# Altium PCB PCB_14layers_1mm73.PcbDoc (part 2 of 4)
Units mm, origin at the board's own origin, x right, y up, seen from the top; angles counter-clockwise.
Board outline 66 x 50 mm, 14 copper layers (Top Layer, Int1 (GND), Int2 (PWR), Int3 (Sign), GND, Int4 (Sign), Int5 (GND), Int6 (PWR), Int7 (Sign), GND2, Int8 (Sign), Int9 (PWR), Int10 (GND), Bottom Layer), stack 1.644 mm thick; 436 components, 541 nets, 2990 pads, 78 vias.
Unrouted connection lines stored in the file: 1647.
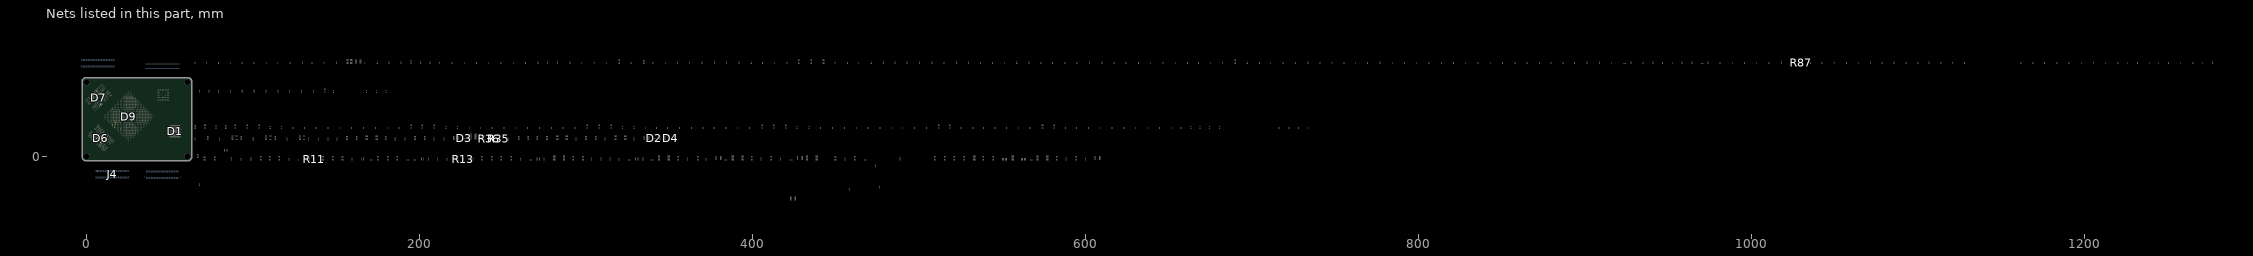
[diagram p14: the nets of this part, all layers, seen from the top]

## Components (designator, comment, footprint, x,y, rotation, side; value= is the part's Value field where it differs from the comment) (continued)
R53 "RC0201FR-0749R9L" RESC0603X02N 728.073,17 r90 top value=49R9
R55 "RC0201FR-0749R9L" RESC0603X02N 716.373,17 r90 top value=49R9
R57 "RC0201FR-07240RL" RESC0603X02N 657.473,17 r90 top value=240R
R58 "RC0402JR-0710KL" RESC1005X04N 680.473,17.3 r90 top value=10K
R59 "RC0402JR-0710KL" RESC1005X04N 668.773,17.3 r90 top value=10K
R61 "RC0201FR-0749R9L" RESC0603X02N 733.973,17 r90 top value=49R9
R63 "RC0201FR-0749R9L" RESC0603X02N 722.273,17 r90 top value=49R9
R65 "RC0603JR-070RL" RESC1608X05N 77.674,17.7 r90 top value=0R
R66 "NC0603" RESC1608X05N 65.174,17.7 r90 top value=NC
R67 "RC0603JR-070RL" RESC1608X05N 83.474,17.7 r90 top value=0R
R68 "RC0402JR-0710KL" RESC1005X04N 168.074,38.9 r90 top value=10K
R69 "RC0402JR-0710KL" RESC1005X04N 173.974,38.9 r90 top value=10K
R70 "RC0402JR-0710KL" RESC1005X04N 179.774,38.9 r90 top value=10K
R71 "RC0603FR-0747KL" RESC1608X05N 142.974,39.4 r90 top value=47K
R72 "RC0402JR-070RL" RESC1005X04N 148.174,38.9 r90 top value=0R
R73 "RC0201FR-07240RL" RESC0603X02N 1220.472,55.999 r90 top value=240R
R74 "RC0402JR-0722RL" RESC1005X04N 271.174,56.299 r90 top value=22R
R75 "RC0402JR-07510KL" RESC1005X04N 200.474,56.299 r90 top value=510K
R76 "RC0201FR-07240RL" RESC0603X02N 1226.272,55.999 r90 top value=240R
R77 "RC0402JR-0722RL" RESC1005X04N 276.974,56.299 r90 top value=22R
R78 "RC0402JR-07100KL" RESC1005X04N 188.774,56.299 r90 top value=100K
R79 "NC0402" RESC1005X04N 206.374,56.299 r90 top value=NC
R80 "RC0402JR-07120KL" RESC1005X04N 150.174,56.299 r90 top value=120K
R81 "RC0201FR-07240RL" RESC0603X02N 1239.472,55.999 r90 top value=240R
R82 "RC0201FR-07240RL" RESC0603X02N 1244.872,55.999 r90 top value=240R
R83 "RC0201JR-072K2L" RESC0603X02N 946.672,55.999 r90 top value=2K2
R84 "RC0201JR-072K2L" RESC0603X02N 952.572,55.999 r90 top value=2K2
R85 "RC0402JR-07100KL" RESC1005X04N 964.372,56.299 r90 top value=100K
R86 "RC0402JR-07120KL" RESC1005X04N 958.572,56.299 r90 top value=120K
R87 "RC0402JR-0722RL" RESC1005X04N 1029.972,56.299 r90 top value=22R
R88 "RC0603JR-070RL" RESC1608X05N 194.874,56.699 r90 top value=0R
R89 "RC0603JR-070RL" RESC1608X05N 334.574,56.699 r90 top value=0R
R90 "RC0201JR-070RL" RESC0603X02N 1265.472,55.999 r90 top value=0R
R91 "RC0402JR-0722RL" RESC1005X04N 1277.272,56.299 r90 top value=22R
R92 "RC0201JR-070RL" RESC0603X02N 1271.272,55.999 r90 top value=0R
R93 "RC0402JR-07100KL" RESC1005X04N 129.574,56.299 r90 top value=100K
R94 "NC0402" RESC1005X04N 1024.072,56.299 r90 top value=NC
R95 "NC0402" RESC1005X04N 935.172,56.299 r90 top value=NC
R96 "NC0402" RESC1005X04N 1018.272,56.299 r90 top value=NC
R97 "NC0402" RESC1005X04N 940.972,56.299 r90 top value=NC
VD1 "AZ5825-01F-MS" DIOC1006X04N 127.074,-1.9 r90 top
ZQ1 "E3SB24.0000F08E11" X322525MOB4SI 157.774,56.999 r0 top value=24MHz

## Footprints (in the part's own frame and the unit in brackets; to place one, negate y for a bottom-side part, rotate by r counter-clockwise, add the part's x,y. Pads: shape width x height; smd on the part's side, far side on the other; paste and mask are expansions set on the pad)
BGA196C50P14X14_1170X1300X170 [mm] "BGA, 196-Leads, Body 11,70x13,00mmx1,70mm, Pitch 0,50mm"
  round 0.25 smd: A1(-3.25,3.25) A2(-2.75,3.25) A3(-2.25,3.25) A4(-1.75,3.25) A5(-1.25,3.25) A6(-0.75,3.25) A7(-0.25,3.25) A8(0.25,3.25) A9(0.75,3.25) A10(1.25,3.25) A11(1.75,3.25) A12(2.25,3.25) A13(2.75,3.25) A14(3.25,3.25) B1(-3.25,2.75) B2(-2.75,2.75) B3(-2.25,2.75) B4(-1.75,2.75) B5(-1.25,2.75) B6(-0.75,2.75) B7(-0.25,2.75) B8(0.25,2.75) B9(0.75,2.75) B10(1.25,2.75) B11(1.75,2.75) B12(2.25,2.75) B13(2.75,2.75) B14(3.25,2.75) C1(-3.25,2.25) C2(-2.75,2.25) C3(-2.25,2.25) C4(-1.75,2.25) C5(-1.25,2.25) C6(-0.75,2.25) C7(-0.25,2.25) C8(0.25,2.25) C9(0.75,2.25) C10(1.25,2.25) C11(1.75,2.25) C12(2.25,2.25) C13(2.75,2.25) C14(3.25,2.25) D1(-3.25,1.75) D2(-2.75,1.75) D3(-2.25,1.75) D4(-1.75,1.75) D12(2.25,1.75) D13(2.75,1.75) D14(3.25,1.75) E1(-3.25,1.25) E2(-2.75,1.25) E3(-2.25,1.25) E5(-1.25,1.25) E6(-0.75,1.25) E7(-0.25,1.25) E8(0.25,1.25) E9(0.75,1.25) E10(1.25,1.25) E12(2.25,1.25) E13(2.75,1.25) E14(3.25,1.25) F1(-3.25,0.75) F2(-2.75,0.75) F3(-2.25,0.75) F5(-1.25,0.75) F10(1.25,0.75) F12(2.25,0.75) F13(2.75,0.75) F14(3.25,0.75) G1(-3.25,0.25) G2(-2.75,0.25) G3(-2.25,0.25) G5(-1.25,0.25) G10(1.25,0.25) G12(2.25,0.25) G13(2.75,0.25) G14(3.25,0.25) H1(-3.25,-0.25) H2(-2.75,-0.25) H3(-2.25,-0.25) H5(-1.25,-0.25) H10(1.25,-0.25) H12(2.25,-0.25) H13(2.75,-0.25) H14(3.25,-0.25) J1(-3.25,-0.75) J2(-2.75,-0.75) J3(-2.25,-0.75) J5(-1.25,-0.75) J10(1.25,-0.75) J12(2.25,-0.75) J13(2.75,-0.75) J14(3.25,-0.75) K1(-3.25,-1.25) K2(-2.75,-1.25) K3(-2.25,-1.25) K5(-1.25,-1.25) K6(-0.75,-1.25) K7(-0.25,-1.25) K8(0.25,-1.25) K9(0.75,-1.25) K10(1.25,-1.25) K12(2.25,-1.25) K13(2.75,-1.25) K14(3.25,-1.25) L1(-3.25,-1.75) L2(-2.75,-1.75) L3(-2.25,-1.75) L12(2.25,-1.75) L13(2.75,-1.75) L14(3.25,-1.75) M1(-3.25,-2.25) M2(-2.75,-2.25) M3(-2.25,-2.25) M4(-1.75,-2.25) M5(-1.25,-2.25) M6(-0.75,-2.25) M7(-0.25,-2.25) M8(0.25,-2.25) M9(0.75,-2.25) M10(1.25,-2.25) M11(1.75,-2.25) M12(2.25,-2.25) M13(2.75,-2.25) M14(3.25,-2.25) N1(-3.25,-2.75) N2(-2.75,-2.75) N3(-2.25,-2.75) N4(-1.75,-2.75) N5(-1.25,-2.75) N6(-0.75,-2.75) N7(-0.25,-2.75) N8(0.25,-2.75) N9(0.75,-2.75) N10(1.25,-2.75) N11(1.75,-2.75) N12(2.25,-2.75) N13(2.75,-2.75) N14(3.25,-2.75) P1(-3.25,-3.25) P2(-2.75,-3.25) P3(-2.25,-3.25) P4(-1.75,-3.25) P5(-1.25,-3.25) P6(-0.75,-3.25) P7(-0.25,-3.25) P8(0.25,-3.25) P9(0.75,-3.25) P10(1.25,-3.25) P11(1.75,-3.25) P12(2.25,-3.25) P13(2.75,-3.25) P14(3.25,-3.25)
  silkscreen extent -6.62,-6.5 5.85,6.5, body extent -5.85,-6.5 5.85,6.5, height 0.72
BGA200C65P12X22_1000X1450X114 [mm]
  round 0.399 smd paste+0 mask+0.05: A1(-4.4,6.825) A2(-3.6,6.825) A3(-2.8,6.825) A4(-2,6.825) A5(-1.2,6.825) A8(1.2,6.825) A9(2,6.825) A10(2.8,6.825) A11(3.6,6.825) A12(4.4,6.825) AA1(-4.4,-6.175) AA2(-3.6,-6.175) AA3(-2.8,-6.175) AA4(-2,-6.175) AA5(-1.2,-6.175) AA8(1.2,-6.175) AA9(2,-6.175) AA10(2.8,-6.175) AA11(3.6,-6.175) AA12(4.4,-6.175) AB1(-4.4,-6.825) AB2(-3.6,-6.825) AB3(-2.8,-6.825) AB4(-2,-6.825) AB5(-1.2,-6.825) AB8(1.2,-6.825) AB9(2,-6.825) AB10(2.8,-6.825) AB11(3.6,-6.825) AB12(4.4,-6.825) B1(-4.4,6.175) B2(-3.6,6.175) B3(-2.8,6.175) B4(-2,6.175) B5(-1.2,6.175) B8(1.2,6.175) B9(2,6.175) B10(2.8,6.175) B11(3.6,6.175) B12(4.4,6.175) C1(-4.4,5.525) C2(-3.6,5.525) C3(-2.8,5.525) C4(-2,5.525) C5(-1.2,5.525) C8(1.2,5.525) C9(2,5.525) C10(2.8,5.525) C11(3.6,5.525) C12(4.4,5.525) D1(-4.4,4.875) D2(-3.6,4.875) D3(-2.8,4.875) D4(-2,4.875) D5(-1.2,4.875) D8(1.2,4.875) D9(2,4.875) D10(2.8,4.875) D11(3.6,4.875) D12(4.4,4.875) E1(-4.4,4.225) E2(-3.6,4.225) E3(-2.8,4.225) E4(-2,4.225) E5(-1.2,4.225) E8(1.2,4.225) E9(2,4.225) E10(2.8,4.225) E11(3.6,4.225) E12(4.4,4.225) F1(-4.4,3.575) F2(-3.6,3.575) F3(-2.8,3.575) F4(-2,3.575) F5(-1.2,3.575) F8(1.2,3.575) F9(2,3.575) F10(2.8,3.575) F11(3.6,3.575) F12(4.4,3.575) G1(-4.4,2.925) G2(-3.6,2.925) G3(-2.8,2.925) G4(-2,2.925) G5(-1.2,2.925) G8(1.2,2.925) G9(2,2.925) G10(2.8,2.925) G11(3.6,2.925) G12(4.4,2.925) H1(-4.4,2.275) H2(-3.6,2.275) H3(-2.8,2.275) H4(-2,2.275) H5(-1.2,2.275) H8(1.2,2.275) H9(2,2.275) H10(2.8,2.275) H11(3.6,2.275) H12(4.4,2.275) J1(-4.4,1.625) J2(-3.6,1.625) J3(-2.8,1.625) J4(-2,1.625) J5(-1.2,1.625) J8(1.2,1.625) J9(2,1.625) J10(2.8,1.625) J11(3.6,1.625) J12(4.4,1.625) K1(-4.4,0.975) K2(-3.6,0.975) K3(-2.8,0.975) K4(-2,0.975) K5(-1.2,0.975) K8(1.2,0.975) K9(2,0.975) K10(2.8,0.975) K11(3.6,0.975) K12(4.4,0.975) N1(-4.4,-0.975) N2(-3.6,-0.975) N3(-2.8,-0.975) N4(-2,-0.975) N5(-1.2,-0.975) N8(1.2,-0.975) N9(2,-0.975) N10(2.8,-0.975) N11(3.6,-0.975) N12(4.4,-0.975) P1(-4.4,-1.625) P2(-3.6,-1.625) P3(-2.8,-1.625) P4(-2,-1.625) P5(-1.2,-1.625) P8(1.2,-1.625) P9(2,-1.625) P10(2.8,-1.625) P11(3.6,-1.625) P12(4.4,-1.625) R1(-4.4,-2.275) R2(-3.6,-2.275) R3(-2.8,-2.275) R4(-2,-2.275) R5(-1.2,-2.275) R8(1.2,-2.275) R9(2,-2.275) R10(2.8,-2.275) R11(3.6,-2.275) R12(4.4,-2.275) T1(-4.4,-2.925) T2(-3.6,-2.925) T3(-2.8,-2.925) T4(-2,-2.925) T5(-1.2,-2.925) T8(1.2,-2.925) T9(2,-2.925) T10(2.8,-2.925) T11(3.6,-2.925) T12(4.4,-2.925) U1(-4.4,-3.575) U2(-3.6,-3.575) U3(-2.8,-3.575) U4(-2,-3.575) U5(-1.2,-3.575) U8(1.2,-3.575) U9(2,-3.575) U10(2.8,-3.575) U11(3.6,-3.575) U12(4.4,-3.575) V1(-4.4,-4.225) V2(-3.6,-4.225) V3(-2.8,-4.225) V4(-2,-4.225) V5(-1.2,-4.225) V8(1.2,-4.225) V9(2,-4.225) V10(2.8,-4.225) V11(3.6,-4.225) V12(4.4,-4.225) W1(-4.4,-4.875) W2(-3.6,-4.875) W3(-2.8,-4.875) W4(-2,-4.875) W5(-1.2,-4.875) W8(1.2,-4.875) W9(2,-4.875) W10(2.8,-4.875) W11(3.6,-4.875) W12(4.4,-4.875) Y1(-4.4,-5.525) Y2(-3.6,-5.525) Y3(-2.8,-5.525) Y4(-2,-5.525) Y5(-1.2,-5.525) Y8(1.2,-5.525) Y9(2,-5.525) Y10(2.8,-5.525) Y11(3.6,-5.525) Y12(4.4,-5.525)
  silkscreen extent -6.05,-8.3 6.05,8.3, body extent -5,-7.25 5,7.25, height 1.14
BGA1088C65P34X34_2300X2300X204N [mm]
  round 0.34 smd: A1(-10.725,10.725) A2(-10.075,10.725) A3(-9.425,10.725) A4(-8.775,10.725) A5(-8.125,10.725) A6(-7.475,10.725) A7(-6.825,10.725) A8(-6.175,10.725) A9(-5.525,10.725) A10(-4.875,10.725) A11(-4.225,10.725) A12(-3.575,10.725) A13(-2.925,10.725) A14(-2.275,10.725) A15(-1.625,10.725) A16(-0.975,10.725) A17(-0.325,10.725) A18(0.325,10.725) A19(0.975,10.725) A20(1.625,10.725) A21(2.275,10.725) A22(2.925,10.725) A23(3.575,10.725) A24(4.225,10.725) A25(4.875,10.725) A26(5.525,10.725) A27(6.175,10.725) A28(6.825,10.725) A30(8.125,10.725) A32(9.425,10.725) A33(10.075,10.725) A34(10.725,10.725) AA1(-10.725,-2.275) AA2(-10.075,-2.275) AA3(-9.425,-2.275) AA4(-8.775,-2.275) AA5(-8.125,-2.275) AA6(-7.475,-2.275) AA7(-6.825,-2.275) AA8(-6.175,-2.275) AA9(-5.525,-2.275) AA10(-4.875,-2.275) AA11(-4.225,-2.275) AA12(-3.575,-2.275) AA13(-2.925,-2.275) AA14(-2.275,-2.275) AA15(-1.625,-2.275) AA16(-0.975,-2.275) AA17(-0.325,-2.275) AA18(0.325,-2.275) AA19(0.975,-2.275) AA20(1.625,-2.275) AA21(2.275,-2.275) AA22(2.925,-2.275) AA23(3.575,-2.275) AA24(4.225,-2.275) AA25(4.875,-2.275) AA26(5.525,-2.275) AA27(6.175,-2.275) AA28(6.825,-2.275) AA29(7.475,-2.275) AA30(8.125,-2.275) AA31(8.775,-2.275) AA32(9.425,-2.275) AA33(10.075,-2.275) AA34(10.725,-2.275) AB1(-10.725,-2.925) AB2(-10.075,-2.925) AB3(-9.425,-2.925) AB4(-8.775,-2.925) AB5(-8.125,-2.925) AB6(-7.475,-2.925) AB7(-6.825,-2.925) AB8(-6.175,-2.925) AB9(-5.525,-2.925) AB10(-4.875,-2.925) AB11(-4.225,-2.925) AB12(-3.575,-2.925) AB13(-2.925,-2.925) AB14(-2.275,-2.925) AB15(-1.625,-2.925) AB16(-0.975,-2.925) AB17(-0.325,-2.925) AB18(0.325,-2.925) AB19(0.975,-2.925) AB20(1.625,-2.925) AB21(2.275,-2.925) AB22(2.925,-2.925) AB23(3.575,-2.925) AB24(4.225,-2.925) AB25(4.875,-2.925) AB26(5.525,-2.925) AB27(6.175,-2.925) AB28(6.825,-2.925) AB29(7.475,-2.925) AB30(8.125,-2.925) AB31(8.775,-2.925) AB32(9.425,-2.925) AB33(10.075,-2.925) AB34(10.725,-2.925) AC1(-10.725,-3.575) AC2(-10.075,-3.575) AC3(-9.425,-3.575) AC4(-8.775,-3.575) AC5(-8.125,-3.575) AC6(-7.475,-3.575) AC7(-6.825,-3.575) AC8(-6.175,-3.575) AC9(-5.525,-3.575) AC10(-4.875,-3.575) AC11(-4.225,-3.575) AC12(-3.575,-3.575) AC13(-2.925,-3.575) AC14(-2.275,-3.575) AC15(-1.625,-3.575) AC16(-0.975,-3.575) AC17(-0.325,-3.575) AC18(0.325,-3.575) AC19(0.975,-3.575) AC20(1.625,-3.575) AC21(2.275,-3.575) AC22(2.925,-3.575) AC23(3.575,-3.575) AC24(4.225,-3.575) AC25(4.875,-3.575) AC26(5.525,-3.575) AC27(6.175,-3.575) AC28(6.825,-3.575) AC29(7.475,-3.575) AC30(8.125,-3.575) AC31(8.775,-3.575) AC32(9.425,-3.575) AC33(10.075,-3.575) AC34(10.725,-3.575) AD1(-10.725,-4.225) AD2(-10.075,-4.225) AD3(-9.425,-4.225) AD4(-8.775,-4.225) AD5(-8.125,-4.225) AD6(-7.475,-4.225) AD7(-6.825,-4.225) AD8(-6.175,-4.225) AD9(-5.525,-4.225) AD10(-4.875,-4.225) AD11(-4.225,-4.225) AD12(-3.575,-4.225) AD13(-2.925,-4.225) AD14(-2.275,-4.225) AD15(-1.625,-4.225) AD16(-0.975,-4.225) AD17(-0.325,-4.225) AD18(0.325,-4.225) AD19(0.975,-4.225) AD20(1.625,-4.225) AD21(2.275,-4.225) AD22(2.925,-4.225) AD23(3.575,-4.225) AD24(4.225,-4.225) AD25(4.875,-4.225) AD26(5.525,-4.225) AD27(6.175,-4.225) AD28(6.825,-4.225) AD29(7.475,-4.225) AD30(8.125,-4.225) AD31(8.775,-4.225) AD32(9.425,-4.225) AD33(10.075,-4.225) AD34(10.725,-4.225) AE1(-10.725,-4.875) AE2(-10.075,-4.875) AE3(-9.425,-4.875) AE4(-8.775,-4.875) AE5(-8.125,-4.875) AE6(-7.475,-4.875) AE7(-6.825,-4.875) AE8(-6.175,-4.875) AE9(-5.525,-4.875) AE11(-4.225,-4.875) AE12(-3.575,-4.875) AE13(-2.925,-4.875) AE14(-2.275,-4.875) AE15(-1.625,-4.875) AE16(-0.975,-4.875) AE18(0.325,-4.875) AE19(0.975,-4.875) AE20(1.625,-4.875) AE21(2.275,-4.875) AE22(2.925,-4.875) AE23(3.575,-4.875) AE24(4.225,-4.875) AE26(5.525,-4.875) AE27(6.175,-4.875) AE28(6.825,-4.875) AE29(7.475,-4.875) AE30(8.125,-4.875) AE31(8.775,-4.875) AE32(9.425,-4.875) AE33(10.075,-4.875) AE34(10.725,-4.875) AF1(-10.725,-5.525) AF2(-10.075,-5.525) AF3(-9.425,-5.525) AF4(-8.775,-5.525) AF5(-8.125,-5.525) AF6(-7.475,-5.525) AF7(-6.825,-5.525) AF8(-6.175,-5.525) AF11(-4.225,-5.525) AF12(-3.575,-5.525) AF13(-2.925,-5.525) AF14(-2.275,-5.525) AF15(-1.625,-5.525) AF16(-0.975,-5.525) AF18(0.325,-5.525) AF19(0.975,-5.525) AF20(1.625,-5.525) AF21(2.275,-5.525) AF22(2.925,-5.525) AF24(4.225,-5.525) AF25(4.875,-5.525) AF27(6.175,-5.525) AF28(6.825,-5.525) AF29(7.475,-5.525) AF30(8.125,-5.525) AF31(8.775,-5.525) AF32(9.425,-5.525) AF33(10.075,-5.525) AF34(10.725,-5.525) AG1(-10.725,-6.175) AG2(-10.075,-6.175) AG3(-9.425,-6.175) AG4(-8.775,-6.175) AG5(-8.125,-6.175) AG6(-7.475,-6.175) AG7(-6.825,-6.175) AG9(-5.525,-6.175) AG10(-4.875,-6.175) AG11(-4.225,-6.175) AG12(-3.575,-6.175) AG13(-2.925,-6.175) AG14(-2.275,-6.175) AG15(-1.625,-6.175) AG16(-0.975,-6.175) AG18(0.325,-6.175) AG19(0.975,-6.175) AG20(1.625,-6.175) AG21(2.275,-6.175) AG22(2.925,-6.175) AG23(3.575,-6.175) AG24(4.225,-6.175) AG25(4.875,-6.175) AG26(5.525,-6.175) AG28(6.825,-6.175) AG29(7.475,-6.175) AG30(8.125,-6.175) AG31(8.775,-6.175) AG32(9.425,-6.175) AG33(10.075,-6.175) AG34(10.725,-6.175) AH2(-10.075,-6.825) AH3(-9.425,-6.825) AH4(-8.775,-6.825) AH5(-8.125,-6.825) AH6(-7.475,-6.825) AH8(-6.175,-6.825) AH9(-5.525,-6.825) AH10(-4.875,-6.825) AH11(-4.225,-6.825) AH12(-3.575,-6.825) AH13(-2.925,-6.825) AH14(-2.275,-6.825) AH15(-1.625,-6.825) AH16(-0.975,-6.825) AH18(0.325,-6.825) AH19(0.975,-6.825) AH20(1.625,-6.825) AH21(2.275,-6.825) AH22(2.925,-6.825) AH23(3.575,-6.825) AH24(4.225,-6.825) AH25(4.875,-6.825) AH26(5.525,-6.825) AH27(6.175,-6.825) AH29(7.475,-6.825) AH30(8.125,-6.825) AH31(8.775,-6.825) AH32(9.425,-6.825) AH33(10.075,-6.825) AH34(10.725,-6.825) AJ1(-10.725,-7.475) AJ2(-10.075,-7.475) AJ3(-9.425,-7.475) AJ4(-8.775,-7.475) AJ5(-8.125,-7.475) AJ7(-6.825,-7.475) AJ8(-6.175,-7.475) AJ9(-5.525,-7.475) AJ10(-4.875,-7.475) AJ11(-4.225,-7.475) AJ12(-3.575,-7.475) AJ13(-2.925,-7.475) AJ14(-2.275,-7.475) AJ15(-1.625,-7.475) AJ16(-0.975,-7.475) AJ18(0.325,-7.475) AJ19(0.975,-7.475) AJ20(1.625,-7.475) AJ21(2.275,-7.475) AJ22(2.925,-7.475) AJ23(3.575,-7.475) AJ24(4.225,-7.475) AJ25(4.875,-7.475) AJ26(5.525,-7.475) AJ27(6.175,-7.475) AJ28(6.825,-7.475) AJ30(8.125,-7.475) AJ31(8.775,-7.475) AJ32(9.425,-7.475) AJ33(10.075,-7.475) AJ34(10.725,-7.475) AK2(-10.075,-8.125) AK3(-9.425,-8.125) AK4(-8.775,-8.125) AK5(-8.125,-8.125) AK6(-7.475,-8.125) AK7(-6.825,-8.125) AK8(-6.175,-8.125) AK9(-5.525,-8.125) AK10(-4.875,-8.125) AK11(-4.225,-8.125) AK12(-3.575,-8.125) AK13(-2.925,-8.125) AK14(-2.275,-8.125) AK15(-1.625,-8.125) AK16(-0.975,-8.125) AK17(-0.325,-8.125) AK18(0.325,-8.125) AK19(0.975,-8.125) AK20(1.625,-8.125) AK21(2.275,-8.125) AK22(2.925,-8.125) AK23(3.575,-8.125) AK24(4.225,-8.125) AK25(4.875,-8.125) AK26(5.525,-8.125) AK27(6.175,-8.125) AK28(6.825,-8.125) AK29(7.475,-8.125) AK30(8.125,-8.125) AK31(8.775,-8.125) AK32(9.425,-8.125) AK33(10.075,-8.125) AK34(10.725,-8.125) AL1(-10.725,-8.775) AL2(-10.075,-8.775) AL3(-9.425,-8.775) AL4(-8.775,-8.775) AL5(-8.125,-8.775) AL6(-7.475,-8.775) AL7(-6.825,-8.775) AL8(-6.175,-8.775) AL9(-5.525,-8.775) AL10(-4.875,-8.775) AL11(-4.225,-8.775) AL12(-3.575,-8.775) AL13(-2.925,-8.775) AL14(-2.275,-8.775) AL15(-1.625,-8.775) AL16(-0.975,-8.775) AL17(-0.325,-8.775) AL18(0.325,-8.775) AL19(0.975,-8.775) AL20(1.625,-8.775) AL21(2.275,-8.775) AL22(2.925,-8.775) AL23(3.575,-8.775) AL24(4.225,-8.775) AL25(4.875,-8.775) AL26(5.525,-8.775) AL27(6.175,-8.775) AL28(6.825,-8.775) AL29(7.475,-8.775) AL30(8.125,-8.775) AL31(8.775,-8.775) AL32(9.425,-8.775) AL33(10.075,-8.775) AL34(10.725,-8.775) AM2(-10.075,-9.425) AM3(-9.425,-9.425) AM4(-8.775,-9.425) AM5(-8.125,-9.425) AM7(-6.825,-9.425) AM8(-6.175,-9.425) AM9(-5.525,-9.425) AM10(-4.875,-9.425) AM12(-3.575,-9.425) AM14(-2.275,-9.425) AM15(-1.625,-9.425) AM16(-0.975,-9.425) AM17(-0.325,-9.425) AM18(0.325,-9.425) AM20(1.625,-9.425) AM22(2.925,-9.425) AM23(3.575,-9.425) AM24(4.225,-9.425) AM25(4.875,-9.425) AM26(5.525,-9.425) AM27(6.175,-9.425) AM28(6.825,-9.425) AM29(7.475,-9.425) AM30(8.125,-9.425) AM31(8.775,-9.425) AM32(9.425,-9.425) AM33(10.075,-9.425) AM34(10.725,-9.425) AN1(-10.725,-10.075) AN2(-10.075,-10.075) AN3(-9.425,-10.075) AN4(-8.775,-10.075) AN5(-8.125,-10.075) AN6(-7.475,-10.075) AN7(-6.825,-10.075) AN8(-6.175,-10.075) AN9(-5.525,-10.075) AN10(-4.875,-10.075) AN11(-4.225,-10.075) AN12(-3.575,-10.075) AN13(-2.925,-10.075) AN14(-2.275,-10.075) AN15(-1.625,-10.075) AN16(-0.975,-10.075) AN17(-0.325,-10.075) AN18(0.325,-10.075) AN19(0.975,-10.075) AN20(1.625,-10.075) AN21(2.275,-10.075) AN22(2.925,-10.075) AN23(3.575,-10.075) AN24(4.225,-10.075) AN25(4.875,-10.075) AN26(5.525,-10.075) AN27(6.175,-10.075) AN28(6.825,-10.075) AN29(7.475,-10.075) AN30(8.125,-10.075) AN31(8.775,-10.075) AN32(9.425,-10.075) AN33(10.075,-10.075) AN34(10.725,-10.075) AP1(-10.725,-10.725) AP2(-10.075,-10.725) AP4(-8.775,-10.725) AP6(-7.475,-10.725) AP7(-6.825,-10.725) AP8(-6.175,-10.725) AP9(-5.525,-10.725) AP10(-4.875,-10.725) AP11(-4.225,-10.725) AP12(-3.575,-10.725) AP13(-2.925,-10.725) AP14(-2.275,-10.725) AP15(-1.625,-10.725) AP16(-0.975,-10.725) AP17(-0.325,-10.725) AP18(0.325,-10.725) AP19(0.975,-10.725) AP20(1.625,-10.725) AP21(2.275,-10.725) AP22(2.925,-10.725) AP23(3.575,-10.725) AP24(4.225,-10.725) AP25(4.875,-10.725) AP26(5.525,-10.725) AP27(6.175,-10.725) AP28(6.825,-10.725) AP29(7.475,-10.725) AP30(8.125,-10.725) AP31(8.775,-10.725) AP32(9.425,-10.725) AP33(10.075,-10.725) AP34(10.725,-10.725) B1(-10.725,10.075) B2(-10.075,10.075) B3(-9.425,10.075) B4(-8.775,10.075) B5(-8.125,10.075) B6(-7.475,10.075) B7(-6.825,10.075) B8(-6.175,10.075) B9(-5.525,10.075) B10(-4.875,10.075) B11(-4.225,10.075) B12(-3.575,10.075) B13(-2.925,10.075) B14(-2.275,10.075) B15(-1.625,10.075) B16(-0.975,10.075) B17(-0.325,10.075) B18(0.325,10.075) B19(0.975,10.075) B20(1.625,10.075) B21(2.275,10.075) B22(2.925,10.075) B23(3.575,10.075) B24(4.225,10.075) B25(4.875,10.075) B26(5.525,10.075) B27(6.175,10.075) B28(6.825,10.075) B29(7.475,10.075) B30(8.125,10.075) B31(8.775,10.075) B32(9.425,10.075) B33(10.075,10.075) B34(10.725,10.075) C1(-10.725,9.425) C2(-10.075,9.425) C3(-9.425,9.425) C4(-8.775,9.425) C5(-8.125,9.425) C6(-7.475,9.425) C7(-6.825,9.425) C8(-6.175,9.425) C9(-5.525,9.425) C10(-4.875,9.425) C11(-4.225,9.425) C12(-3.575,9.425) C13(-2.925,9.425) C14(-2.275,9.425) C15(-1.625,9.425) C16(-0.975,9.425) C17(-0.325,9.425) C18(0.325,9.425) C19(0.975,9.425) C20(1.625,9.425) C21(2.275,9.425) C22(2.925,9.425) C23(3.575,9.425) C24(4.225,9.425) C25(4.875,9.425) C26(5.525,9.425) C27(6.175,9.425) C28(6.825,9.425) C29(7.475,9.425) C30(8.125,9.425) C31(8.775,9.425) C32(9.425,9.425) C33(10.075,9.425) C34(10.725,9.425) D1(-10.725,8.775) D2(-10.075,8.775) D3(-9.425,8.775) D4(-8.775,8.775) D5(-8.125,8.775) D7(-6.825,8.775) D9(-5.525,8.775) D10(-4.875,8.775) D11(-4.225,8.775) D13(-2.925,8.775) D14(-2.275,8.775) D16(-0.975,8.775) D17(-0.325,8.775) D19(0.975,8.775) D20(1.625,8.775) D21(2.275,8.775) D22(2.925,8.775) D23(3.575,8.775) D24(4.225,8.775) D25(4.875,8.775) D26(5.525,8.775) D27(6.175,8.775) D28(6.825,8.775) D29(7.475,8.775) D30(8.125,8.775) D31(8.775,8.775) D32(9.425,8.775) D33(10.075,8.775) E1(-10.725,8.125) E2(-10.075,8.125) E3(-9.425,8.125) E4(-8.775,8.125) E5(-8.125,8.125) E6(-7.475,8.125) E7(-6.825,8.125) E8(-6.175,8.125) E9(-5.525,8.125) E10(-4.875,8.125) E11(-4.225,8.125) E12(-3.575,8.125) E13(-2.925,8.125) E14(-2.275,8.125) E16(-0.975,8.125) E17(-0.325,8.125) E18(0.325,8.125) E19(0.975,8.125) E20(1.625,8.125) E21(2.275,8.125) E22(2.925,8.125) E23(3.575,8.125) E24(4.225,8.125) E25(4.875,8.125) E26(5.525,8.125) E27(6.175,8.125) E28(6.825,8.125) E29(7.475,8.125) E30(8.125,8.125) E31(8.775,8.125) E32(9.425,8.125) E33(10.075,8.125) E34(10.725,8.125) F1(-10.725,7.475) F2(-10.075,7.475) F3(-9.425,7.475) F4(-8.775,7.475) F5(-8.125,7.475) F7(-6.825,7.475) F8(-6.175,7.475) F9(-5.525,7.475) F10(-4.875,7.475) F11(-4.225,7.475) F12(-3.575,7.475) F13(-2.925,7.475) F14(-2.275,7.475) F15(-1.625,7.475) F16(-0.975,7.475) F18(0.325,7.475) F19(0.975,7.475) F20(1.625,7.475) F21(2.275,7.475) F22(2.925,7.475) F23(3.575,7.475) F24(4.225,7.475) F25(4.875,7.475) F26(5.525,7.475) F27(6.175,7.475) F28(6.825,7.475) F30(8.125,7.475) F31(8.775,7.475) F32(9.425,7.475) F33(10.075,7.475) G1(-10.725,6.825) G2(-10.075,6.825) G3(-9.425,6.825) G4(-8.775,6.825) G6(-7.475,6.825) G8(-6.175,6.825) G9(-5.525,6.825) G10(-4.875,6.825) G11(-4.225,6.825) G12(-3.575,6.825) G13(-2.925,6.825) G14(-2.275,6.825) G15(-1.625,6.825) G16(-0.975,6.825) G18(0.325,6.825) G19(0.975,6.825) G20(1.625,6.825) G21(2.275,6.825) G22(2.925,6.825) G23(3.575,6.825) G24(4.225,6.825) G25(4.875,6.825) G26(5.525,6.825) G27(6.175,6.825) G29(7.475,6.825) G30(8.125,6.825) G31(8.775,6.825) G32(9.425,6.825) G33(10.075,6.825) G34(10.725,6.825) H1(-10.725,6.175) H2(-10.075,6.175) H3(-9.425,6.175) H4(-8.775,6.175) H5(-8.125,6.175) H6(-7.475,6.175) H7(-6.825,6.175) H9(-5.525,6.175) H10(-4.875,6.175) H11(-4.225,6.175) H12(-3.575,6.175) H13(-2.925,6.175) H14(-2.275,6.175) H15(-1.625,6.175) H16(-0.975,6.175) H18(0.325,6.175) H19(0.975,6.175) H20(1.625,6.175) H21(2.275,6.175) H22(2.925,6.175) H23(3.575,6.175) H24(4.225,6.175) H25(4.875,6.175) H26(5.525,6.175) H28(6.825,6.175) H29(7.475,6.175) H30(8.125,6.175) H31(8.775,6.175) H32(9.425,6.175) H33(10.075,6.175) J1(-10.725,5.525) J2(-10.075,5.525) J3(-9.425,5.525) J4(-8.775,5.525) J5(-8.125,5.525) J6(-7.475,5.525) J7(-6.825,5.525) J8(-6.175,5.525) J10(-4.875,5.525) J11(-4.225,5.525) J12(-3.575,5.525) J13(-2.925,5.525) J14(-2.275,5.525) J15(-1.625,5.525) J16(-0.975,5.525) J18(0.325,5.525) J19(0.975,5.525) J20(1.625,5.525) J21(2.275,5.525) J22(2.925,5.525) J23(3.575,5.525) J24(4.225,5.525) J25(4.875,5.525) J27(6.175,5.525) J28(6.825,5.525) J29(7.475,5.525) J30(8.125,5.525) J31(8.775,5.525) J32(9.425,5.525) J33(10.075,5.525) J34(10.725,5.525) K1(-10.725,4.875) K2(-10.075,4.875) K3(-9.425,4.875) K4(-8.775,4.875) K5(-8.125,4.875) K6(-7.475,4.875) K7(-6.825,4.875) K8(-6.175,4.875) K9(-5.525,4.875) K11(-4.225,4.875) K12(-3.575,4.875) K13(-2.925,4.875) K14(-2.275,4.875) K15(-1.625,4.875) K16(-0.975,4.875) K18(0.325,4.875) K19(0.975,4.875) K20(1.625,4.875) K21(2.275,4.875) K22(2.925,4.875) K23(3.575,4.875) K24(4.225,4.875) K26(5.525,4.875) K27(6.175,4.875) K28(6.825,4.875) K29(7.475,4.875) K30(8.125,4.875) K31(8.775,4.875) K32(9.425,4.875) K33(10.075,4.875) K34(10.725,4.875) L1(-10.725,4.225) L2(-10.075,4.225) L3(-9.425,4.225) L4(-8.775,4.225) L5(-8.125,4.225) L6(-7.475,4.225) L7(-6.825,4.225) L8(-6.175,4.225) L9(-5.525,4.225) L10(-4.875,4.225) L11(-4.225,4.225) L12(-3.575,4.225) L13(-2.925,4.225) L14(-2.275,4.225) L15(-1.625,4.225) L16(-0.975,4.225) L17(-0.325,4.225) L18(0.325,4.225) L19(0.975,4.225) L20(1.625,4.225) L21(2.275,4.225) L22(2.925,4.225) L23(3.575,4.225) L24(4.225,4.225) L25(4.875,4.225) L26(5.525,4.225) L27(6.175,4.225) L28(6.825,4.225) L29(7.475,4.225) L30(8.125,4.225) L31(8.775,4.225) L32(9.425,4.225) L33(10.075,4.225) M1(-10.725,3.575) M2(-10.075,3.575) M3(-9.425,3.575) M5(-8.125,3.575) M6(-7.475,3.575) M7(-6.825,3.575) M8(-6.175,3.575) M9(-5.525,3.575) M10(-4.875,3.575) M11(-4.225,3.575) M12(-3.575,3.575) M13(-2.925,3.575) M14(-2.275,3.575) M15(-1.625,3.575) M16(-0.975,3.575) M17(-0.325,3.575) M18(0.325,3.575) M19(0.975,3.575) M20(1.625,3.575) M21(2.275,3.575) M22(2.925,3.575) M23(3.575,3.575) M24(4.225,3.575) M25(4.875,3.575) M26(5.525,3.575) M27(6.175,3.575) M28(6.825,3.575) M29(7.475,3.575) M30(8.125,3.575) M31(8.775,3.575) M32(9.425,3.575) M33(10.075,3.575) M34(10.725,3.575) N1(-10.725,2.925) N2(-10.075,2.925) N3(-9.425,2.925) N4(-8.775,2.925) N5(-8.125,2.925) N6(-7.475,2.925) N7(-6.825,2.925) N8(-6.175,2.925) N9(-5.525,2.925) N10(-4.875,2.925) N11(-4.225,2.925) N12(-3.575,2.925) N13(-2.925,2.925) N14(-2.275,2.925) N15(-1.625,2.925) N16(-0.975,2.925) N17(-0.325,2.925) N18(0.325,2.925) N19(0.975,2.925) N20(1.625,2.925) N21(2.275,2.925) N22(2.925,2.925) N23(3.575,2.925) N24(4.225,2.925) N25(4.875,2.925) N26(5.525,2.925) N27(6.175,2.925) N28(6.825,2.925) N29(7.475,2.925) N30(8.125,2.925) N31(8.775,2.925) N32(9.425,2.925) N33(10.075,2.925) N34(10.725,2.925) P1(-10.725,2.275) P2(-10.075,2.275) P3(-9.425,2.275) P4(-8.775,2.275) P5(-8.125,2.275) P6(-7.475,2.275) P7(-6.825,2.275) P8(-6.175,2.275) P9(-5.525,2.275) P10(-4.875,2.275) P11(-4.225,2.275) P12(-3.575,2.275) P13(-2.925,2.275) P14(-2.275,2.275) P15(-1.625,2.275) P16(-0.975,2.275) P17(-0.325,2.275) P18(0.325,2.275) P19(0.975,2.275) P20(1.625,2.275) P21(2.275,2.275) P22(2.925,2.275) P23(3.575,2.275) P24(4.225,2.275) P25(4.875,2.275) P26(5.525,2.275) P27(6.175,2.275) P28(6.825,2.275) P29(7.475,2.275) P30(8.125,2.275) P31(8.775,2.275) P32(9.425,2.275) P33(10.075,2.275) P34(10.725,2.275) R1(-10.725,1.625) R2(-10.075,1.625) R3(-9.425,1.625) R5(-8.125,1.625) R6(-7.475,1.625) R7(-6.825,1.625) R8(-6.175,1.625) R9(-5.525,1.625) R10(-4.875,1.625) R11(-4.225,1.625) R12(-3.575,1.625) R13(-2.925,1.625) R14(-2.275,1.625) R15(-1.625,1.625) R16(-0.975,1.625) R17(-0.325,1.625) R18(0.325,1.625) R19(0.975,1.625) R20(1.625,1.625) R21(2.275,1.625) R22(2.925,1.625) R23(3.575,1.625) R24(4.225,1.625) R25(4.875,1.625) R26(5.525,1.625) R27(6.175,1.625) R28(6.825,1.625) R29(7.475,1.625) R30(8.125,1.625) R31(8.775,1.625) R32(9.425,1.625) R33(10.075,1.625) R34(10.725,1.625) T1(-10.725,0.975) T2(-10.075,0.975) T3(-9.425,0.975) T4(-8.775,0.975) T5(-8.125,0.975) T6(-7.475,0.975) T7(-6.825,0.975) T8(-6.175,0.975) T9(-5.525,0.975) T10(-4.875,0.975) T11(-4.225,0.975) T12(-3.575,0.975) T13(-2.925,0.975) T14(-2.275,0.975) T15(-1.625,0.975) T16(-0.975,0.975) T17(-0.325,0.975) T18(0.325,0.975) T19(0.975,0.975) T20(1.625,0.975) T21(2.275,0.975) T22(2.925,0.975) T23(3.575,0.975) T24(4.225,0.975) T25(4.875,0.975) T26(5.525,0.975) T27(6.175,0.975) T28(6.825,0.975) T29(7.475,0.975) T30(8.125,0.975) T31(8.775,0.975) T32(9.425,0.975) T33(10.075,0.975) T34(10.725,0.975) U1(-10.725,0.325) U2(-10.075,0.325) U3(-9.425,0.325) U4(-8.775,0.325) U5(-8.125,0.325) U11(-4.225,0.325) U12(-3.575,0.325) U13(-2.925,0.325) U14(-2.275,0.325) U15(-1.625,0.325) U16(-0.975,0.325) U17(-0.325,0.325) U18(0.325,0.325) U19(0.975,0.325) U20(1.625,0.325) U21(2.275,0.325) U22(2.925,0.325) U23(3.575,0.325) U24(4.225,0.325) U30(8.125,0.325) U31(8.775,0.325) U32(9.425,0.325) U33(10.075,0.325) U34(10.725,0.325) V1(-10.725,-0.325) V2(-10.075,-0.325) V3(-9.425,-0.325) V4(-8.775,-0.325) V5(-8.125,-0.325) V6(-7.475,-0.325) V7(-6.825,-0.325) V8(-6.175,-0.325) V9(-5.525,-0.325) V10(-4.875,-0.325) V11(-4.225,-0.325) V12(-3.575,-0.325) V13(-2.925,-0.325) V14(-2.275,-0.325) V15(-1.625,-0.325) V16(-0.975,-0.325) V17(-0.325,-0.325) V18(0.325,-0.325) V19(0.975,-0.325) V20(1.625,-0.325) V21(2.275,-0.325) V22(2.925,-0.325) V23(3.575,-0.325) V24(4.225,-0.325) V25(4.875,-0.325) V26(5.525,-0.325) V27(6.175,-0.325) V28(6.825,-0.325) V29(7.475,-0.325) V30(8.125,-0.325) V31(8.775,-0.325) V32(9.425,-0.325) V33(10.075,-0.325) V34(10.725,-0.325) W1(-10.725,-0.975) W2(-10.075,-0.975) W3(-9.425,-0.975) W4(-8.775,-0.975) W5(-8.125,-0.975) W6(-7.475,-0.975) W7(-6.825,-0.975) W8(-6.175,-0.975) W9(-5.525,-0.975) W10(-4.875,-0.975) W11(-4.225,-0.975) W12(-3.575,-0.975) W13(-2.925,-0.975) W14(-2.275,-0.975) W15(-1.625,-0.975) W16(-0.975,-0.975) W17(-0.325,-0.975) W18(0.325,-0.975) W19(0.975,-0.975) W20(1.625,-0.975) W21(2.275,-0.975) W22(2.925,-0.975) W23(3.575,-0.975) W24(4.225,-0.975) W25(4.875,-0.975) W26(5.525,-0.975) W27(6.175,-0.975) W28(6.825,-0.975) W29(7.475,-0.975) W30(8.125,-0.975) W31(8.775,-0.975) W32(9.425,-0.975) W33(10.075,-0.975) W34(10.725,-0.975) Y1(-10.725,-1.625) Y2(-10.075,-1.625) Y3(-9.425,-1.625) Y4(-8.775,-1.625) Y5(-8.125,-1.625) Y6(-7.475,-1.625) Y7(-6.825,-1.625) Y8(-6.175,-1.625) Y9(-5.525,-1.625) Y10(-4.875,-1.625) Y11(-4.225,-1.625) Y12(-3.575,-1.625) Y13(-2.925,-1.625) Y14(-2.275,-1.625) Y15(-1.625,-1.625) Y16(-0.975,-1.625) Y17(-0.325,-1.625) Y18(0.325,-1.625) Y19(0.975,-1.625) Y20(1.625,-1.625) Y21(2.275,-1.625) Y22(2.925,-1.625) Y23(3.575,-1.625) Y24(4.225,-1.625) Y26(5.525,-1.625) Y27(6.175,-1.625) Y28(6.825,-1.625) Y29(7.475,-1.625) Y30(8.125,-1.625) Y31(8.775,-1.625) Y32(9.425,-1.625) Y33(10.075,-1.625) Y34(10.725,-1.625)
  silkscreen extent -12.5,-12.5 12.5,12.5, body extent -11.5,-11.5 11.5,11.5, height 1.89
CAPC0603X03N [mm] "Chip Capacitor, 2-Leads, Body 0,60x0,30mm, IPC Medium Density"
  rrect50% 0.42x0.42 smd: 1(-0.35,0) 2(0.35,0)
  body extent -0.44,-0.15 0.44,0.15, height 0.31
CAPC1005X06N [mm] "Chip Capacitor, 2-Leads, Body 1,00x0,50mm, IPC Medium Density"
  rrect30% 0.6x0.64 smd: 1(-0.5,0) 2(0.5,0)
  body extent -0.73,-0.25 0.73,0.25, height 0.51
CAPC1608X08N [mm] "Chip Capacitor, 2-Leads, Body 1,60x0,80mm, IPC Medium Density"
  rrect20% 0.9x0.95 smd: 1(-0.8,0) 2(0.8,0)
  body extent -1.23,-0.4 1.23,0.4, height 0.8
CAPC2012X12N [mm] "Chip Capacitor, 2-Leads, Body 2,00x1,25mm, IPC Medium Density"
  rrect20% 1.1x1.4 smd: 1(-0.9,0) 2(0.9,0)
  body extent -1.4,-0.63 1.4,0.63, height 0.8
CONN100_DF40C-100DP-0.4V51_HIR [mm]
  rect 0.356x0.66 smd paste-0.33 mask+0: 0(-10.2,1.355) 0(-10.2,-1.355) 0(10.2,-1.355) 0(10.2,1.355)
  rect 0.23x0.66 smd paste+0 mask+0: 1(9.8,1.355) 2(9.8,-1.355) 3(9.4,1.355) 4(9.4,-1.355) 5(9,1.355) 6(9,-1.355) 7(8.6,1.355) 8(8.6,-1.355) 9(8.2,1.355) 10(8.2,-1.355) 11(7.8,1.355) 12(7.8,-1.355) 13(7.4,1.355) 14(7.4,-1.355) 15(7,1.355) 16(7,-1.355) 17(6.6,1.355) 18(6.6,-1.355) 19(6.2,1.355) 20(6.2,-1.355) 21(5.8,1.355) 22(5.8,-1.355) 23(5.4,1.355) 24(5.4,-1.355) 25(5,1.355) 26(5,-1.355) 27(4.6,1.355) 28(4.6,-1.355) 29(4.2,1.355) 30(4.2,-1.355) 31(3.8,1.355) 32(3.8,-1.355) 33(3.4,1.355) 34(3.4,-1.355) 35(3,1.355) 36(3,-1.355) 37(2.6,1.355) 38(2.6,-1.355) 39(2.2,1.355) 40(2.2,-1.355) 41(1.8,1.355) 42(1.8,-1.355) 43(1.4,1.355) 44(1.4,-1.355) 45(1,1.355) 46(1,-1.355) 47(0.6,1.355) 48(0.6,-1.355) 49(0.2,1.355) 50(0.2,-1.355) 51(-0.2,1.355) 52(-0.2,-1.355) 53(-0.6,1.355) 54(-0.6,-1.355) 55(-1,1.355) 56(-1,-1.355) 57(-1.4,1.355) 58(-1.4,-1.355) 59(-1.8,1.355) 60(-1.8,-1.355) 61(-2.2,1.355) 62(-2.2,-1.355) 63(-2.6,1.355) 64(-2.6,-1.355) 65(-3,1.355) 66(-3,-1.355) 67(-3.4,1.355) 68(-3.4,-1.355) 69(-3.8,1.355) 70(-3.8,-1.355) 71(-4.2,1.355) 72(-4.2,-1.355) 73(-4.6,1.355) 74(-4.6,-1.355) 75(-5,1.355) 76(-5,-1.355) 77(-5.4,1.355) 78(-5.4,-1.355) 79(-5.8,1.355) 80(-5.8,-1.355) 81(-6.2,1.355) 82(-6.2,-1.355) 83(-6.6,1.355) 84(-6.6,-1.355) 85(-7,1.355) 86(-7,-1.355) 87(-7.4,1.355) 88(-7.4,-1.355) 89(-7.8,1.355) 90(-7.8,-1.355) 91(-8.2,1.355) 92(-8.2,-1.355) 93(-8.6,1.355) 94(-8.6,-1.355) 95(-9,1.355) 96(-9,-1.355) 97(-9.4,1.355) 98(-9.4,-1.355) 99(-9.8,1.355) 100(-9.8,-1.355)
  silkscreen extent -10.88,-1.05 10.88,2.96, body extent -10.76,-1.49 10.76,1.48, height 1.15
CONN_DF12NA3.0-80DS-0.5V51_HIR [mm]
  round 0.6 hole 0.6 unplated: 0(-10.8,-1.5) 0(10.8,-1.5)
  rect 0.25x1.2 smd: 1(9.75,2) 2(9.75,-2) 3(9.25,2) 4(9.25,-2) 5(8.75,2) 6(8.75,-2) 7(8.25,2) 8(8.25,-2) 9(7.75,2) 10(7.75,-2) 11(7.25,2) 12(7.25,-2) 13(6.75,2) 14(6.75,-2) 15(6.25,2) 16(6.25,-2) 17(5.75,2) 18(5.75,-2) 19(5.25,2) 20(5.25,-2) 21(4.75,2) 22(4.75,-2) 23(4.25,2) 24(4.25,-2) 25(3.75,2) 26(3.75,-2) 27(3.25,2) 28(3.25,-2) 29(2.75,2) 30(2.75,-2) 31(2.25,2) 32(2.25,-2) 33(1.75,2) 34(1.75,-2) 35(1.25,2) 36(1.25,-2) 37(0.75,2) 38(0.75,-2) 39(0.25,2) 40(0.25,-2) 41(-0.25,2) 42(-0.25,-2) 43(-0.75,2) 44(-0.75,-2) 45(-1.25,2) 46(-1.25,-2) 47(-1.75,2) 48(-1.75,-2) 49(-2.25,2) 50(-2.25,-2) 51(-2.75,2) 52(-2.75,-2) 53(-3.25,2) 54(-3.25,-2) 55(-3.75,2) 56(-3.75,-2) 57(-4.25,2) 58(-4.25,-2) 59(-4.75,2) 60(-4.75,-2) 61(-5.25,2) 62(-5.25,-2) 63(-5.75,2) 64(-5.75,-2) 65(-6.25,2) 66(-6.25,-2) 67(-6.75,2) 68(-6.75,-2) 69(-7.25,2) 70(-7.25,-2) 71(-7.75,2) 72(-7.75,-2) 73(-8.25,2) 74(-8.25,-2) 75(-8.75,2) 76(-8.75,-2) 77(-9.25,2) 78(-9.25,-2) 79(-9.75,2) 80(-9.75,-2)
  silkscreen extent -11.35,-2.2 11.35,3.84, body extent -11.05,-2.3 11.05,2.3, height 2.2
DIOC1006X04N [mm] "Chip Diode, 2-Leads, Body 1,00x0,60mm, IPC Medium Density"
  rect 0.3x0.5 smd: 1(-0.35,0) 2(0.35,0)
  body extent -0.5,-0.3 0.5,0.3, height 0.38
INDC2016X10N [mm] "Chip Inductor, 2-Leads, Body 2,00x1,60mm, IPC Medium Density"
  rrect50% 0.55x1.6 smd: 1(-0.725,0) 2(0.725,0)
  body extent -1,-0.8 1,0.8, height 1.05
INDC3225X12N [mm] "Chip Inductor, 2-Leads, Body 3,20x2,50mm, IPC Medium Density"
  rrect50% 0.8x2.5 smd: 1(-1.4,0) 2(1.4,0)
  silkscreen extent -0.4,-1.26 0.4,1.26, body extent -1.6,-1.25 1.6,1.25, height 1.2
INDP4040X26N [mm] "Precision Wire Wound Inductor, 2-Leads, Body 4,00x4,00mm, IPC Medium Density"
  rrect50% 1.1x3.7 smd: 1(-1.5,0) 2(1.5,0)
  silkscreen extent -2.1,-2.1 2.1,2.1, body extent -2.1,-2.1 2.1,2.1, height 2.6
QFN35P700X700X90_HS-69N [mm] "QFN, 68-Leads, Body 7,00x7,00mm, Pitch 0,35mm, Thermal Pad 5,49x5,49mm, IPC Medium Density"
  rrect50% 0.9x0.15 smd: 1(-3.4,2.8) 2(-3.4,2.45) 3(-3.4,2.1) 4(-3.4,1.75) 5(-3.4,1.4) 6(-3.4,1.05) 7(-3.4,0.7) 8(-3.4,0.35) 9(-3.4,0) 10(-3.4,-0.35) 11(-3.4,-0.7) 12(-3.4,-1.05) 13(-3.4,-1.4) 14(-3.4,-1.75) 15(-3.4,-2.1) 16(-3.4,-2.45) 17(-3.4,-2.8) 35(3.4,-2.8) 36(3.4,-2.45) 37(3.4,-2.1) 38(3.4,-1.75) 39(3.4,-1.4) 40(3.4,-1.05) 41(3.4,-0.7) 42(3.4,-0.35) 43(3.4,0) 44(3.4,0.35) 45(3.4,0.7) 46(3.4,1.05) 47(3.4,1.4) 48(3.4,1.75) 49(3.4,2.1) 50(3.4,2.45) 51(3.4,2.8)
  rrect50% 0.15x0.9 smd: 18(-2.8,-3.4) 19(-2.45,-3.4) 20(-2.1,-3.4) 21(-1.75,-3.4) 22(-1.4,-3.4) 23(-1.05,-3.4) 24(-0.7,-3.4) 25(-0.35,-3.4) 26(0,-3.4) 27(0.35,-3.4) 28(0.7,-3.4) 29(1.05,-3.4) 30(1.4,-3.4) 31(1.75,-3.4) 32(2.1,-3.4) 33(2.45,-3.4) 34(2.8,-3.4) 52(2.8,3.4) 53(2.45,3.4) 54(2.1,3.4) 55(1.75,3.4) 56(1.4,3.4) 57(1.05,3.4) 58(0.7,3.4) 59(0.35,3.4) 60(0,3.4) 61(-0.35,3.4) 62(-0.7,3.4) 63(-1.05,3.4) 64(-1.4,3.4) 65(-1.75,3.4) 66(-2.1,3.4) 67(-2.45,3.4) 68(-2.8,3.4)
  rect 5.49x5.49 smd: 69(0,0)
  silkscreen extent -4.48,-3.7 3.7,3.7, body extent -3.5,-3.5 3.5,3.5, height 0.85
RESC0603X02N [mm] "Chip Resistor, 2-Leads, Body 0,60x0,30mm, IPC Medium Density"
  rrect50% 0.4x0.35 smd: 1(-0.325,0) 2(0.325,0)
  body extent -0.44,-0.15 0.44,0.15, height 0.31
RESC1005X04N [mm] "Chip Resistor, 2-Leads, Body 1,00x0,50mm, IPC Medium Density"
  rrect35% 0.6x0.6 smd: 1(-0.5,0) 2(0.5,0)
  body extent -0.5,-0.25 0.5,0.25, height 0.34
RESC1608X05N [mm] "Chip Resistor, 2-Leads, Body 1,60x0,85mm, IPC Medium Density"
  rrect25% 0.85x0.85 smd: 1(-0.775,0) 2(0.775,0)
  body extent -0.8,-0.4 0.8,0.4, height 0.44
SOT95P280X145-5N [mm]
  rrect30% 1.2x0.6 smd: 1(-1.25,0.95) 2(-1.25,0) 3(-1.25,-0.95) 4(1.25,-0.95) 5(1.25,0.95)
  silkscreen extent -1.42,-1.45 0.3,1.92, body extent -1.4,-1.45 1.4,1.45, height 1.2
SOT95P280X145-6N [mm]
  rrect30% 1.2x0.6 smd: 1(-1.25,0.95) 2(-1.25,0) 3(-1.25,-0.95) 4(1.25,-0.95) 5(1.25,0) 6(1.25,0.95)
  silkscreen extent -1.42,-1.45 0.3,1.92, body extent -1.4,-1.45 1.4,1.45, height 1.2
WLCSP20_RCC-L [mil]
  round 8 smd: A1(-23.62,31.5) A2(-7.87,31.5) A3(7.87,31.5) A4(23.62,31.5) B1(-23.62,15.75) B2(-7.87,15.75) B3(7.87,15.75) B4(23.62,15.75) C1(-23.62,0) C2(-7.87,0) C3(7.87,0) C4(23.62,0) D1(-23.62,-15.75) D2(-7.87,-15.75) D3(7.87,-15.75) D4(23.62,-15.75) E1(-23.62,-31.5) E2(-7.87,-31.5) E3(7.87,-31.5) E4(23.62,-31.5)
  silkscreen extent -49,33 -45,37, body extent -33,-41 33,41, height 25
X322525MOB4SI [mm]
  rrect50% 1.4x1.2 smd: 1(-1.1,-0.85) 2(1.1,-0.85) 3(1.1,0.85) 4(-1.1,0.85)
  silkscreen extent -2.2,-1.25 0.22,1.25, body extent -1.68,-1.33 1.68,1.33, height 0.9

## Part data
C1 C2 C3 C4 C5: "Ceramic capacitor, 2.2uF, X5R, ±10%, 6.3V, 0402, -55...+85°C", Dielectric=X5R, Manufacturer=TDK, Package=0402, Temperature=-55...+85°C, Tolerance=±10%, Voltage=6.3V, ComponentLink1Description=Link, ComponentLink1URL=https://product.tdk.com/en/system/files/dam/doc/product/capacitor/ceramic/mlcc/catalog/mlcc_commercial_general_en.pdf, ComponentLink2Description=LocalLink, ComponentLink2URL=C:\Users\Public\Documents\Altium\datasheet\Capacitors\mlcc_commercial_general_en.pdf, PartNumber=C1005X5R0J225K050BC, Type="Ceramic SMD"
C6 C7 C8 C9 C11 C13 C14 C17 C18 C112 C113 C115 C116 C147 C148 C149 C150: "Ceramic capacitor, 1uF, X5R, ±10%, 6.3V, 0402, -55...+85°C", Dielectric=X5R, Manufacturer=TDK, Package=0402, Temperature=-55...+85°C, Tolerance=±10%, Voltage=6.3V, ComponentLink1Description=Link, ComponentLink1URL=https://product.tdk.com/en/system/files/dam/doc/product/capacitor/ceramic/mlcc/catalog/mlcc_commercial_general_en.pdf, ComponentLink2Description=LocalLink, ComponentLink2URL=C:\Users\Public\Documents\Altium\datasheet\Capacitors\mlcc_commercial_general_en.pdf, PartNumber=C1005X5R0J105K050BB, Type="Ceramic SMD"
C10 C15 C29 C31 C32 C35 C36 C37 C77 C78 C93: "Ceramic capacitor, 1uF, X5R, ±10%, 10V, 0402, -55...+85°C", Dielectric=X5R, Manufacturer=TDK, Package=0402, Temperature=-55...+85°C, Tolerance=±10%, Voltage=10V, ComponentLink1Description=Link, ComponentLink1URL=https://product.tdk.com/en/system/files/dam/doc/product/capacitor/ceramic/mlcc/catalog/mlcc_commercial_general_en.pdf, ComponentLink2Description=LocalLink, ComponentLink2URL=C:\Users\Public\Documents\Altium\datasheet\Capacitors\mlcc_commercial_general_en.pdf, PartNumber=C1005X5R1A105K050BB, Type="Ceramic SMD"
C16: "Ceramic capacitor, 1nF, C0G, ±5%, 25V, 0402, -55...+125°C", Dielectric=C0G, Manufacturer=TDK, Package=0402, Temperature=-55...+125°C, Tolerance=±5%, Voltage=25V, ComponentLink1Description=Link, ComponentLink1URL=https://product.tdk.com/en/system/files/dam/doc/product/capacitor/ceramic/mlcc/catalog/mlcc_commercial_general_en.pdf, ComponentLink2Description=LocalLink, ComponentLink2URL=C:\Users\Public\Documents\Altium\datasheet\Capacitors\mlcc_commercial_general_en.pdf, PartNumber=C1005C0G1E102J050BA, Type="Ceramic SMD"
C19 C20 C21 C22 C73 C74 C75 C76 C87 C88: "Ceramic capacitor, 22uF, X5R, ±10%, 10V, 0805, -55...+85°", Dielectric=X5R, Manufacturer=TDK, Package=0805, Temperature=-55...+85°C, Tolerance=±10%, Voltage=10V, ComponentLink1Description=Link, ComponentLink1URL=https://product.tdk.com/system/files/dam/doc/product/capacitor/ceramic/mlcc/catalog/mlcc_commercial_general_en.pdf, ComponentLink2Description=LocalLink, ComponentLink2URL=C:\Users\Public\Documents\Altium\datasheet\Capacitors\mlcc_commercial_general_en.pdf, PartNumber=C2012X5R1A226K125AB, Type="Ceramic SMD"
C23 C24 C25 C26 C27 C28 C34 C43 C44 C51 C52 C60 C66 C89 C101 C105 C106 C143 C144 C154 C181: "Ceramic capacitor, 10uF, X5R, ±10%, 10V, 0603, -55...+85°C", Dielectric=X5R, Manufacturer=TDK, Package=0603, Temperature=-55...+85°C, Tolerance=±10%, Voltage=10V, ComponentLink1Description=Link, ComponentLink1URL=https://product.tdk.com/system/files/dam/doc/product/capacitor/ceramic/mlcc/catalog/mlcc_commercial_general_en.pdf, ComponentLink2Description=LocalLink, ComponentLink2URL=C:\Users\Public\Documents\Altium\datasheet\Capacitors\mlcc_commercial_general_en.pdf, PartNumber=C1608X5R1A106K080AC, Type="Ceramic SMD"
C30 C41 C92: "Ceramic capacitor, 100pF, C0G, ±10%, 50V, 0402, -55...+125°C", Dielectric=C0G, Manufacturer=TDK, Package=0402, Temperature=-55...+125°C, Tolerance=±10%, Voltage=50V, ComponentLink1Description=Link, ComponentLink1URL=https://product.tdk.com/en/system/files/dam/doc/product/capacitor/ceramic/mlcc/catalog/mlcc_commercial_general_en.pdf, ComponentLink2Description=LocalLink, ComponentLink2URL=C:\Users\Public\Documents\Altium\datasheet\Capacitors\mlcc_commercial_general_en.pdf, PartNumber=C1005C0G1H101K050BA, Type="Ceramic SMD"
C33 C39 C42 C45 C46 C47 C49 C54 C55 C56: "Ceramic capacitor, 47uF, X5R, ±20%, 6.3V, 0805, -55...+85°", Dielectric=X5R, Manufacturer=TDK, Package=0805, Temperature=-55...+85°C, Tolerance=±20%, Voltage=6.3V, ComponentLink1Description=Link, ComponentLink1URL=https://product.tdk.com/system/files/dam/doc/product/capacitor/ceramic/mlcc/catalog/mlcc_commercial_general_en.pdf, ComponentLink2Description=LocalLink, ComponentLink2URL=C:\Users\Public\Documents\Altium\datasheet\Capacitors\mlcc_commercial_general_en.pdf, PartNumber=C2012X5R0J476M125AC, Type="Ceramic SMD"
C38 C40 C50 C53 C57 C58 C59 C61 C62 C63 C64 C65 C67 C68 C69 C70 C71 C72 C79 C80 C81 C82 C83 C85 C94 C95 C96 C102 C103 C141 C142 C225 C232 C235 C248: "Ceramic capacitor, 22uF, X5R, ±20%, 6.3V, 0603, -55...+85°C", Dielectric=X5R, Manufacturer=TDK, Package=0603, Temperature=-55...+85°C, Tolerance=±20%, Voltage=6.3V, ComponentLink1Description=Link, ComponentLink1URL=https://product.tdk.com/system/files/dam/doc/product/capacitor/ceramic/mlcc/catalog/mlcc_commercial_general_en.pdf, ComponentLink2Description=LocalLink, ComponentLink2URL=C:\Users\Public\Documents\Altium\datasheet\Capacitors\mlcc_commercial_general_en.pdf, PartNumber=C1608X5R0J226M080AC, Type="Ceramic SMD"
C48 C99 C104 C109 C110 C145 C146 C157 C273 C353 C355 C356: "Ceramic capacitor, 10uF, X5R, ±10%, 6.3V, 0603, -55...+85°C", Dielectric=X5R, Manufacturer=TDK, Package=0603, Temperature=-55...+85°C, Tolerance=±10%, Voltage=6.3V, ComponentLink1Description=Link, ComponentLink1URL=https://product.tdk.com/system/files/dam/doc/product/capacitor/ceramic/mlcc/catalog/mlcc_commercial_general_en.pdf, ComponentLink2Description=LocalLink, ComponentLink2URL=C:\Users\Public\Documents\Altium\datasheet\Capacitors\mlcc_commercial_general_en.pdf, PartNumber=C1608X5R0J106K080AB, Type="Ceramic SMD"
C90: "Ceramic capacitor, 0.1uF, X5R, ±10%, 25V, 0402, -55...+85°C", Dielectric=X5R, Manufacturer=TDK, Package=0402, Temperature=-55...+85°C, Tolerance=±10%, Voltage=25V, ComponentLink1Description=Link, ComponentLink1URL=https://product.tdk.com/en/system/files/dam/doc/product/capacitor/ceramic/mlcc/catalog/mlcc_commercial_general_en.pdf, ComponentLink2Description=LocalLink, ComponentLink2URL=C:\Users\Public\Documents\Altium\datasheet\Capacitors\mlcc_commercial_general_en.pdf, PartNumber=C1005X5R1E104K050BC, Type="Ceramic SMD"
C97 C182 C183 C184 C185 C186 C187 C192: "Ceramic capacitor, 0.1uF, X5R, ±10%, 10V, 0402, -55...+85°C", Dielectric=X5R, Manufacturer=TDK, Package=0402, Temperature=-55...+85°C, Tolerance=±10%, Voltage=10V, ComponentLink1Description=Link, ComponentLink1URL=https://product.tdk.com/en/system/files/dam/doc/product/capacitor/ceramic/mlcc/catalog/mlcc_commercial_general_en.pdf, ComponentLink2Description=LocalLink, ComponentLink2URL=C:\Users\Public\Documents\Altium\datasheet\Capacitors\mlcc_commercial_general_en.pdf, PartNumber=C1005X5R1A104K050BA, Type="Ceramic SMD"
C107 C111 C114 C117 C118 C119 C120 C121 C122 C123 C124 C125 C126 C127 C128 C129 C130 C131 C132 C133 C134 C135 C136 C137 C138 C139 C140 C151 C152 C153 C155 C156 C158 C160 C161 C162 C163 C164 C165 C166 C167 C168 C169 C170 C171 C172 C173 C174 C175 C176 C177 C178 C179 C180 C195 C198 C199 C201 C202 C203 C212 C214 C219 C220 C223 C241 C246 C253 C254 C260 C267 C268 C269 C270 C271 C272 C274 C275 C276 C277 C281 C282 C285 C289 C295 C303 C305 C306 C307 C308 C309 C311 C314 C316 C325 C329 C331 C332 C333 C334 C335 C336 C337 C338 C339 C340 C341 C342 C343 C344 C345 C346 C347 C348 C349 C350 C351 C352: "Ceramic capacitor, 0.1uF, X5R, ±10%, 10V, 0201, -55...+85°C", Dielectric=X5R, Manufacturer=TDK, Package=0201, Temperature=-55...+85°C, Tolerance=±10%, Voltage=10V, ComponentLink1Description=Link, ComponentLink1URL=https://product.tdk.com/system/files/dam/doc/product/capacitor/ceramic/mlcc/catalog/mlcc_commercial_general_en.pdf, ComponentLink2Description=LocalLink, ComponentLink2URL=C:\Users\Public\Documents\Altium\datasheet\Capacitors\mlcc_commercial_general_en.pdf, PartNumber=C0603X5R1A104K030BC, Type="Ceramic SMD"
C108 C159: "Ceramic capacitor, 1nF, X5R, ±10%, 25V, 0201, -55...+85°C", Dielectric=X5R, Manufacturer=TDK, Package=0201, Temperature=-55...+85°C, Tolerance=±10%, Voltage=25V, ComponentLink1Description=Link, ComponentLink1URL=https://product.tdk.com/system/files/dam/doc/product/capacitor/ceramic/mlcc/catalog/mlcc_commercial_general_en.pdf, ComponentLink2Description=LocalLink, ComponentLink2URL=C:\Users\Public\Documents\Altium\datasheet\Capacitors\mlcc_commercial_general_en.pdf, PartNumber=C0603X5R1E102K030BA, Type="Ceramic SMD"
C188 C189 C208 C234 C250 C251 C264 C287 C290 C312 C318 C320 C323 C324 C326 C354 C358 C359: "Ceramic capacitor, 4,7uF, X5R, ±10%, 6.3V, 0402, -55...+85°C", Dielectric=X5R, Manufacturer=TDK, Package=0402, Temperature=-55...+85°C, Tolerance=±10%, Voltage=6.3V, ComponentLink1Description=Link, ComponentLink1URL=https://product.tdk.com/en/system/files/dam/doc/product/capacitor/ceramic/mlcc/catalog/mlcc_commercial_general_en.pdf, ComponentLink2Description=LocalLink, ComponentLink2URL=C:\Users\Public\Documents\Altium\datasheet\Capacitors\mlcc_commercial_general_en.pdf, PartNumber=C1005X5R0J475K050BC, Type="Ceramic SMD"
C190: "Ceramic capacitor, 2.2uF, X5R, ±10%, 10V, 0402, -55...+85°C", Dielectric=X5R, Manufacturer=TDK, Package=0402, Temperature=-55...+85°C, Tolerance=±10%, Voltage=10V, ComponentLink1Description=Link, ComponentLink1URL=https://product.tdk.com/en/system/files/dam/doc/product/capacitor/ceramic/mlcc/catalog/mlcc_commercial_general_en.pdf, ComponentLink2Description=LocalLink, ComponentLink2URL=C:\Users\Public\Documents\Altium\datasheet\Capacitors\mlcc_commercial_general_en.pdf, PartNumber=C1005X5R1A225K050BC, Type="Ceramic SMD"
C191: "Ceramic capacitor, 10pF, C0G, ±5%, 50V, 0402, -55...+125°C", Dielectric=C0G, Manufacturer=TDK, Package=0402, Temperature=-55...+125°C, Tolerance=±5%, Voltage=50V, ComponentLink1Description=Link, ComponentLink1URL=https://product.tdk.com/en/system/files/dam/doc/product/capacitor/ceramic/mlcc/catalog/mlcc_commercial_general_en.pdf, ComponentLink2Description=LocalLink, ComponentLink2URL=C:\Users\Public\Documents\Altium\datasheet\Capacitors\mlcc_commercial_general_en.pdf, PartNumber=C1005C0G1H100D050BA, Type="Ceramic SMD"
C193 C197: "Ceramic capacitor, 18pF, C0G, ±5%, 50V, 0402, -55...+125°C", Dielectric=C0G, Manufacturer=TDK, Package=0402, Temperature=-55...+125°C, Tolerance=±5%, Voltage=50V, ComponentLink1Description=Link, ComponentLink1URL=https://product.tdk.com/en/system/files/dam/doc/product/capacitor/ceramic/mlcc/catalog/mlcc_commercial_general_en.pdf, ComponentLink2Description=LocalLink, ComponentLink2URL=C:\Users\Public\Documents\Altium\datasheet\Capacitors\mlcc_commercial_general_en.pdf, PartNumber=C1005C0G1H180J050BA, Type="Ceramic SMD"
C194 C196 C200 C204 C207 C209 C210 C211 C215 C217 C228 C233 C236 C240 C247 C257 C258 C259 C261 C262 C263 C265 C266 C278 C279 C280 C283 C284 C286 C288 C292 C297 C304 C310 C313 C317 C319 C321 C322 C327 C330: "Ceramic capacitor, 1uF, X5R, ±20%, 6.3V, 0201, -55...+85°C", Dielectric=X5R, Manufacturer=TDK, Package=0201, Temperature=-55...+85°C, Tolerance=±20%, Voltage=6.3V, ComponentLink1Description=Link, ComponentLink1URL=https://product.tdk.com/system/files/dam/doc/product/capacitor/ceramic/mlcc/catalog/mlcc_commercial_general_en.pdf, ComponentLink2Description=LocalLink, ComponentLink2URL=C:\Users\Public\Documents\Altium\datasheet\Capacitors\mlcc_commercial_general_en.pdf, PartNumber=C0603X5R0J105M030BC, Type="Ceramic SMD"
C205 C206 C227 C230 C243 C244 C245 C249 C252 C255 C256 C291 C293 C294 C296 C328: "Ceramic capacitor, 10uF, X5R, ±20%, 4V, 0402, -55...+85°C", Dielectric=X5R, Manufacturer=Yageo, Package=0402, Temperature=-55...+85°C, Tolerance=±5%, Voltage=4V, ComponentLink1Description=Link, ComponentLink1URL=https://www.yageo.com/upload/media/product/productsearch/datasheet/mlcc/UPY-GPHC_X5R_4V-to-50V_30.pdf, ComponentLink2Description=LocalLink, ComponentLink2URL=C:\Users\Public\Documents\Altium\datasheet\Capacitors\UPY-GPHC_X5R_4V-to-50V_30.pdf, PartNumber=CC0402MRX5R4BB106, Type="Ceramic SMD"
C357 C?: "Ceramic capacitor, 10nF, X7R, ±10%, 50V, 0402, -55...+125°C", Dielectric=X7R, Manufacturer=Murata, Package=0402, Temperature=-55...+125°C, Tolerance=±10%, Voltage=50V, ComponentLink1Description=Link, ComponentLink1URL=https://www.murata.com/products/productdetail?partno=GRM155R71H103KA88%23, ComponentLink2Description=LocalLink, ComponentLink2URL=C:\Users\Public\Documents\Altium\Datasheet\Capacitors\GRM155R71H103KA88#.pdf, PartNumber=GRM155R71H103KA88D, Type="Ceramic SMD"
D1: "Complex power-management integrated circuit (PMIC)", Manufacturer=RockChip, Package=QFN68, Temperature=-40...+125°C, ComponentLink1Description=LocalLink, ComponentLink1URL=C:\Users\Public\Documents\Altium\Datasheet\ICs_PWR\RK806-1.pdf, PartNumber=RK806-1, Type=PMIC
D2 D3 D4: "Synchronous step down DC/DC regulator", Manufacturer=RockChip, Package=WLCSP-20, Temperature=-40...+125°C, ComponentLink1Description=LocalLink, ComponentLink1URL=C:\Users\Public\Documents\Altium\Datasheet\ICs_PWR\RK860.pdf, Type=Step-down
  D2 D3: PartNumber=RK860-2
  D4: PartNumber=RK860-3